# Altium PCB DAP-PCB-REV-3.2.PcbDoc (part 3 of 5)
Units mm, origin at the board's own origin, x right, y up, seen from the top; angles counter-clockwise.
Board outline 54.75 x 54.75 mm, 6 copper layers (L1 (SIG/PWR), L2 (GND), L3 (SIG), L4 (PWR), L5 (GND), L6 (SIG/PWR)), stack 1.65 mm thick; 308 components, 179 nets, 954 pads, 440 vias.
Unrouted connection lines stored in the file: 7.
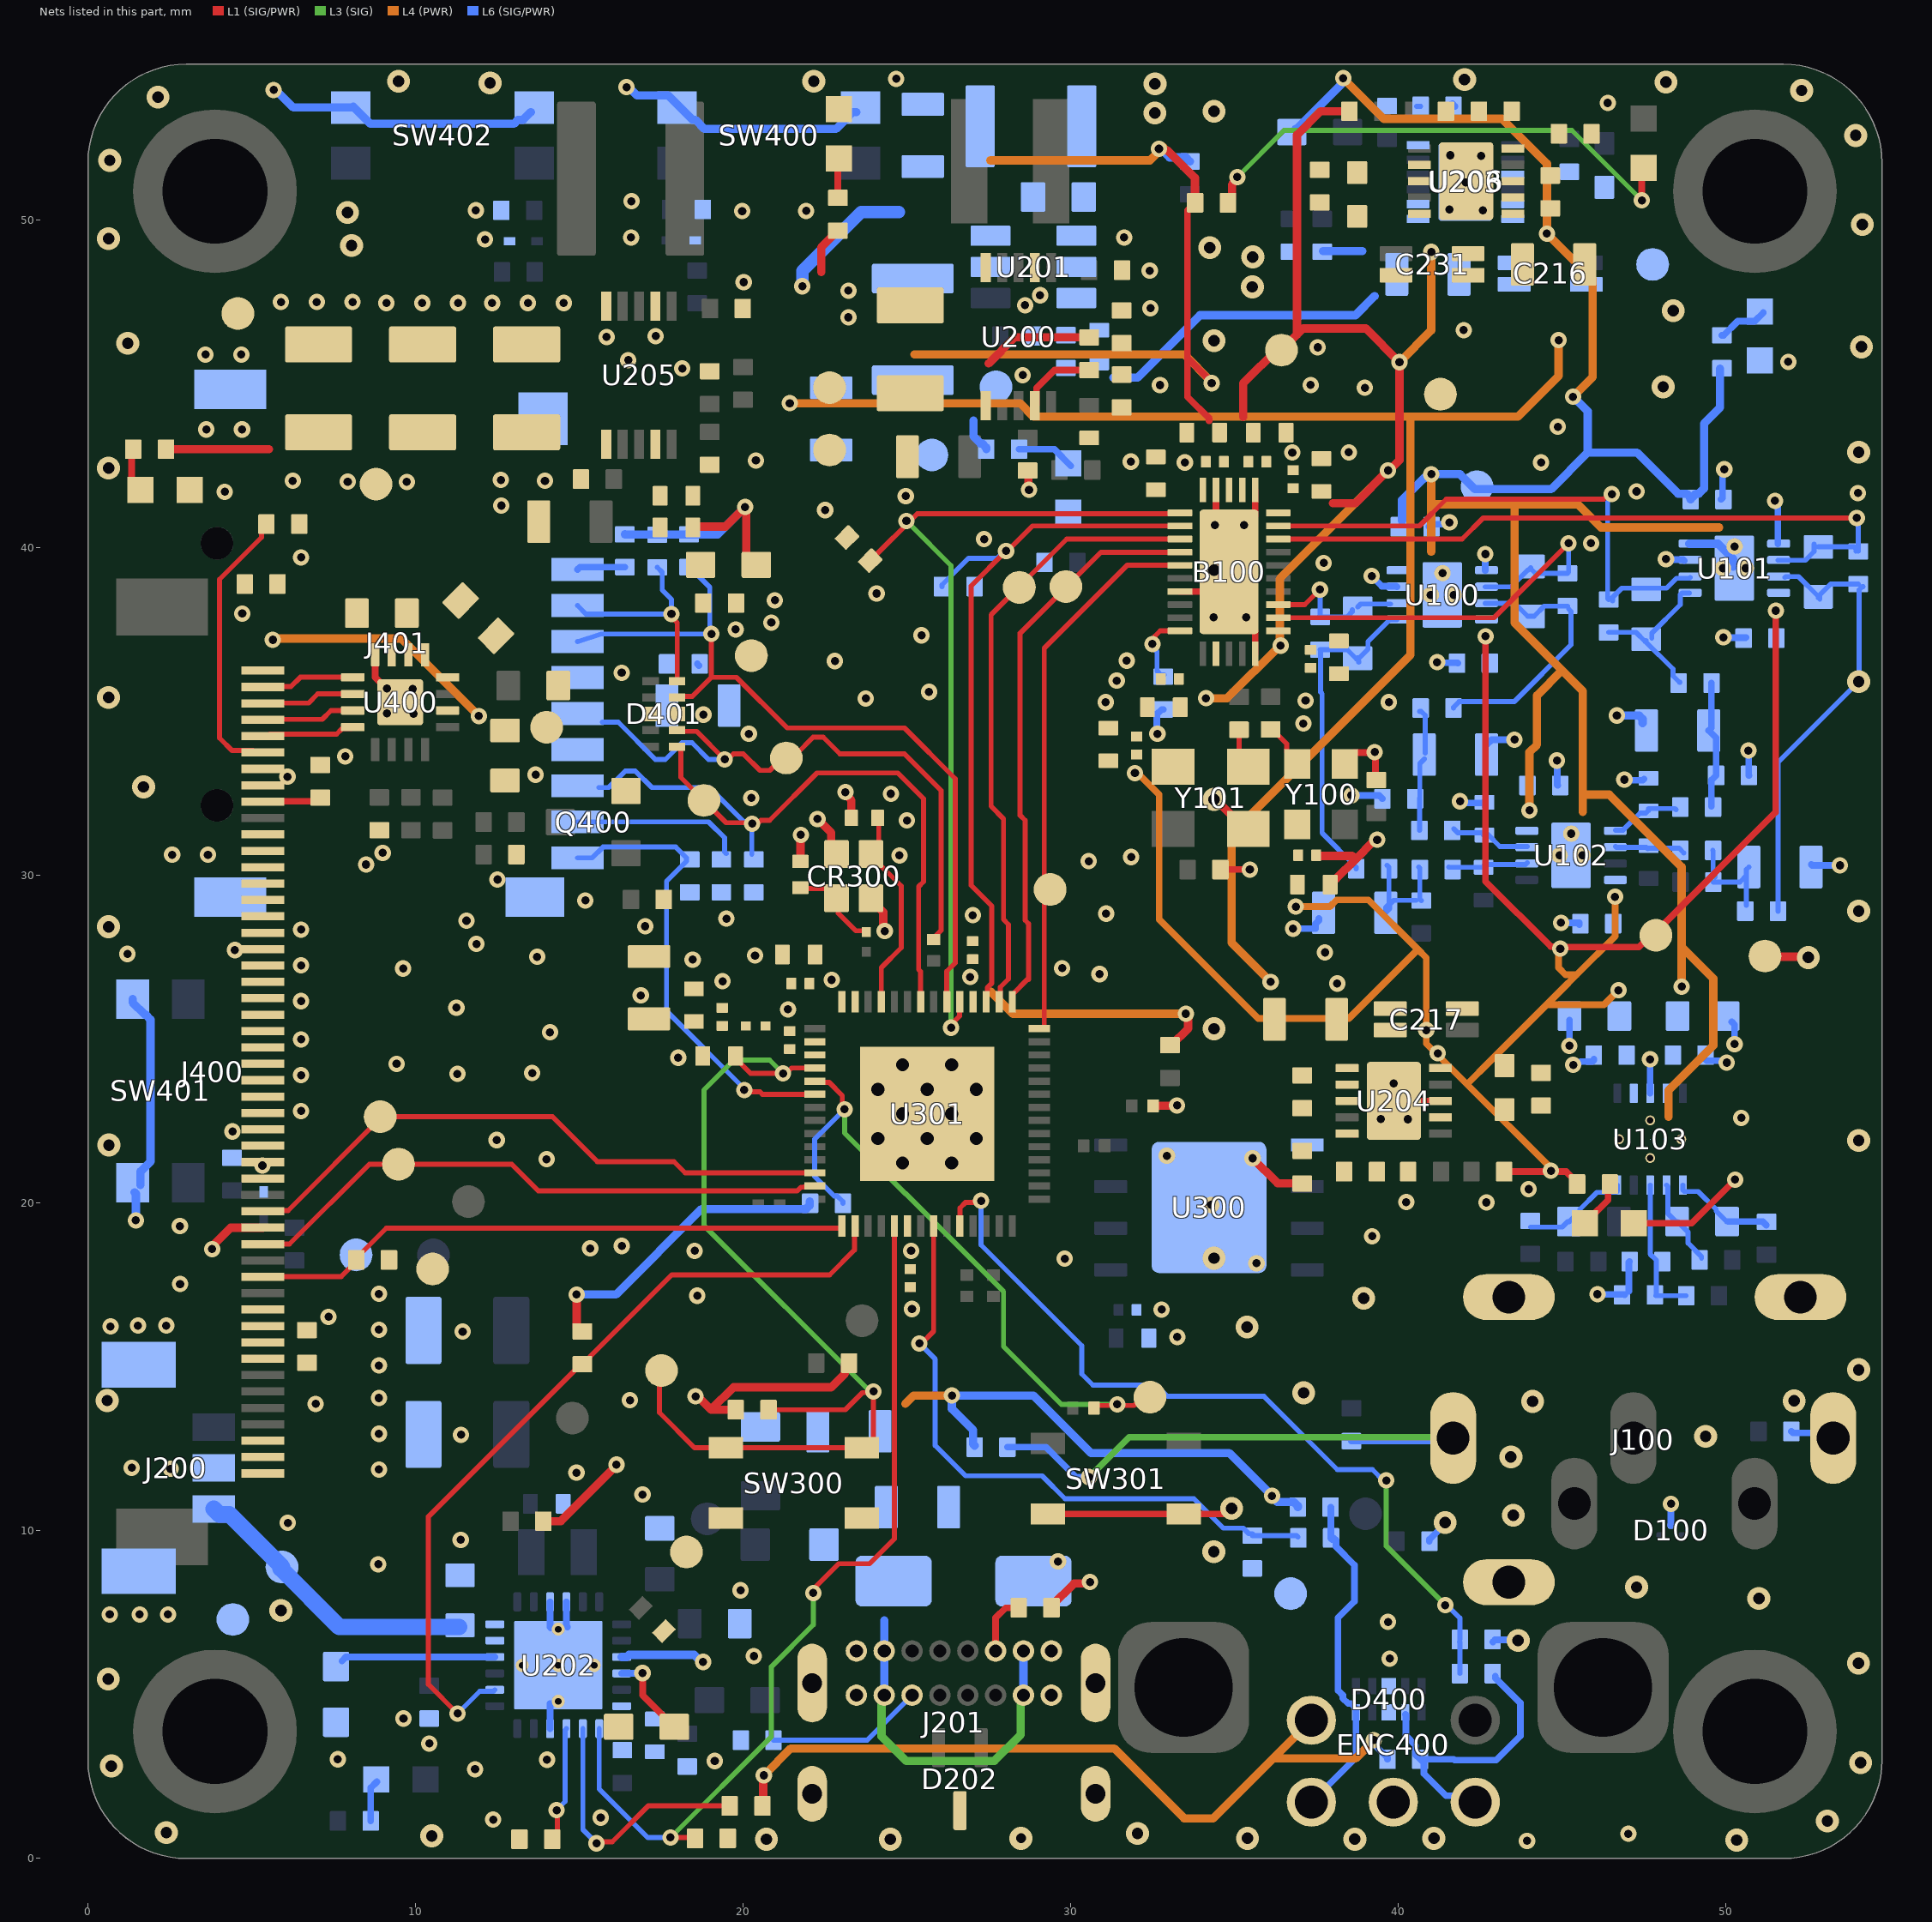
[diagram p6: the nets of this part, all layers, seen from the top]

## Part data (continued)
J200: library part #1-137, <Value>=3x1, Manufacturer 1=Molex, Manufacturer Part Number 1=5055670381, Package=None, Supplier Part Number 1=WM22227CT-ND, <Termination>=SMD, AL-PN=#1-137, Availability=Unavailable, Creator Project=DAP, Footprint Status=Unverified, Lead Time="19 Weeks", MF="{'manufacturer': u'Molex'}", MP=436500329, Notes="No Drawing", PartType=Connector, Price=None, Status=Unverified, SubType=Header, Supplier 1=Digikey, Supplier Label="Connector Header Surface Mount, Right Angle 3 position 0.049\" (1.25mm)", Type=Standard
J201: library part #1-069, <Rating>=5A, <Value>=48V, Manufacturer 1=GCT, Manufacturer Part Number 1=USB4085-GF-A, Package=None, Supplier Part Number 1=2073-USB4085-GF-ACT-ND, <Spec>=USB-C, <Termination>=Thru, AL-PN=#1-069, Availability="In Stock", Check_prices=https://www.snapeda.com/parts/USB4085-GF-A/Global+Connector+Technology/view-part/?ref=eda, Creator Project=DAP, Footprint Status=Verified, Lead Time="7 Weeks", MF="Global Connector Technology", MP=USB4085-GF-A, PartType=Connector, Price=None, Purchase-URL=https://pricing.snapeda.com/search/part/USB4085-GF-A/?ref=eda, SnapEDA_Link=https://www.snapeda.com/parts/USB4085-GF-A/Global+Connector+Technology/view-part/?ref=snap, Status=Unverified, SubType=USB, Supplier 1=Digikey, Supplier Label="USB-C (USB TYPE-C) USB 2.0 Receptacle Connector 24 (16+8 Dummy) Position Through Hole, Right Angle", Type=Standard
J400: library part #1-117, <Value>=50-Pin, Manufacturer 1="Amphenol ICC", Manufacturer Part Number 1=F32D-1A7Y1-21050, Package=None, Supplier Part Number 1=609-F32D-1A7Y1-21050CT-ND, <Footprint>=R/A, <Termination>=SMD, AL-PN=#1-117, Check_prices=https://www.snapeda.com/parts/F32D-1A7Y1-21050/Amphenol+FCI/view-part/?ref=eda, Creator Project=DAP, Footprint Status=Verified, Lead Time="13 Weeks", MF="Amphenol ICC (FCI)", MP=F32D-1A7Y1-21050, PartType=Connector, SnapEDA_Link=https://www.snapeda.com/parts/F32D-1A7Y1-21050/Amphenol+FCI/view-part/?ref=snap, Status=Unverified, SubType=FFC, Supplier 1=Digikey, Supplier Label="50 Position FFC, FPC Connector Contacts, Top and Bottom 0.020\" (0.50mm) Surface Mount, Right Angle", Type=Standard
J401: library part #1-126, Manufacturer 1="Same Sky", Manufacturer Part Number 1=MSD-1-A, Package=None, Supplier Part Number 1=2223-MSD-1-ACT-ND, <Termination>=SMD, AL-PN=#1-126, Check_prices=https://www.snapeda.com/parts/MSD-1-A/Same+Sky/view-part/?ref=eda, Creator Project=DAP, Footprint Status=Verified, Lead Time="8 Weeks", MF="Same Sky", MP=MSD-1-A, PartType=Connector, SnapEDA_Link=https://www.snapeda.com/parts/MSD-1-A/Same+Sky/view-part/?ref=snap, Status=Unverified, SubType=Micro-SD, Supplier 1=Digikey, Supplier Label="9 (8 + 1) Position Card Connector microSD™ Surface Mount, Right Angle Gold", Type=Standard
L200: library part #1-076, <Rating>=3.5A, <Tolerance>=0.2, <Value>=6.8uH, Manufacturer 1="Bourns Inc.", Manufacturer Part Number 1=SRP4030FA-6R8M, Supplier Part Number 1=SRP4030FA-6R8MCT-ND, <Spec>=74.1mOhm, <Termination>=SMD, AL-PN=#1-076, Creator Project=DAP, Footprint Status=Verified, Lead Time="22 Weeks", PartType=Inductor, Status=Unverified, SubType=Shielded, Supplier 1=Digikey, Supplier Label="6.8 µH Shielded Drum Core, Wirewound Inductor 4 A 74.1mOhm Max Nonstandard", Type=Standard
L201 L202: library part #1-090, <Rating>=400mA, <Tolerance>=0.2, <Value>=22uH, Manufacturer 1="Murata Electronics", Manufacturer Part Number 1=490-LQW32FT220M2HLTR, Supplier Part Number 1=490-LQW32FT220M2HLCT-ND, <Footprint>=1210, <Spec>=810mOhm, <Termination>=SMD, AL-PN=#1-090, Creator Project=DAP, Footprint Status=Verified, Lead Time="25 Weeks", Notes="No 3D", PartType=Inductor, Status=Unverified, SubType=Shielded, Supplier 1=Digikey, Supplier Label="22 µH Shielded Wirewound Inductor 300 mA 810mOhm Max 1210 (3225 Metric)", Type=Standard
L203: library part #1-151, <Rating>=2A, <Tolerance>=0.2, <Value>=1uH, Manufacturer 1="Murata Electronics", Manufacturer Part Number 1=DFE201210U-1R0M=P2, Supplier Part Number 1=490-18104-1-ND, <Spec>=95mOhm, <Termination>=SMD, AL-PN=#1-151, Creator Project=DAP, Footprint Status=Verified, Lead Time="21 Weeks", PartType=Inductor, Status=Unverified, SubType=Shielded, Supplier 1=Digikey, Supplier Label="1 µH Shielded Drum Core, Wirewound Inductor 2 A 95mOhm Max 0805 (2012 Metric)", Type=Standard
L204: library part #1-094, <Rating>=3.7A, <Tolerance>=0.2, <Value>=18uH, Manufacturer 1=Coilcraft, Manufacturer Part Number 1=XGL5050-183MEC, Supplier Part Number 1=2457-XGL5050-183MEC-ND, <Spec>=62.5mOhm, <Termination>=SMD, AL-PN=#1-094, Creator Project=DAP, Footprint Status=Verified, Lead Time=N/A, PartType=Inductor, Status=Unverified, SubType=Shielded, Supplier 1=Digikey, Supplier Label="18 µH Shielded Molded Inductor 4.5 A 62.5mOhm Max Nonstandard", Type=Standard
L300: library part #1-143, <Rating>=600mA, <Value>=2nH, Manufacturer 1="Murata Electronics", Manufacturer Part Number 1=LQP03HQ2N0B02D, Supplier Part Number 1=490-13895-1-ND, <Footprint>=0201, <Spec>=120mOhm, <Termination>=SMD, AL-PN=#1-143, Creator Project=DAP, Footprint Status=Verified, Lead Time="15 Weeks", PartType=Inductor, Status=Unverified, SubType=Shielded, Supplier 1=Digikey, Supplier Label="2 nH Unshielded Thick Film Inductor 600 mA 120mOhm Max 0201 (0603 Metric)", Type=Standard
L301: library part #1-150, <Rating>=140mA, <Tolerance>=0.03, <Value>=24nH, Manufacturer 1="Murata Electronics", Manufacturer Part Number 1=LQP03TN24NH02D, Supplier Part Number 1=490-13004-1-ND, <Footprint>=0201, <Spec>=2.3Ohm, <Termination>=SMD, AL-PN=#1-150, Creator Project=DAP, Footprint Status=Verified, Lead Time="15 Weeks", PartType=Inductor, Status=Unverified, SubType=Shielded, Supplier 1=Digikey, Supplier Label="24 nH Unshielded Thick Film Inductor 140 mA 2.3Ohm Max 0201 (0603 Metric)", Type=Standard
Q400: library part #1-130, <Rating>=2.5Vgs, <Value>=N-Type, Manufacturer 1=MCC, Manufacturer Part Number 1=2N7002-TP, Package="TO-236 MCC", Supplier Part Number 1=2N7002-TPMSCT-ND, <Termination>=SMD, AL-PN=#1-130, Check_prices=https://www.snapeda.com/parts/2N7002-TP/Micro+Commercial/view-part/?ref=eda, Creator Project=DAP, Footprint Status=Verified, Lead Time=N/A, MF="Micro Commercial", MP=2N7002-TP, PartType=Transistor, SnapEDA_Link=https://www.snapeda.com/parts/2N7002-TP/Micro+Commercial/view-part/?ref=snap, Status=Unverified, SubType=MOSFET, Supplier 1=Digikey, Supplier Label="N-Channel 60 V 115mA (Ta) 1.08W Surface Mount SOT-23", Type=Standard
R100 R101 R102 R103 R116 R117 R121 R123 R131 R134: library part #1-105, <Rating>=1/16W, <Tolerance>=0.001, <Value>=499Ohm, Manufacturer 1=YAGEO, Manufacturer Part Number 1=RT0402BRD07499RL, Supplier Part Number 1=YAG1440CT-ND, <Footprint>=0402, <Termination>=SMD, AL-PN=#1-105, Creator Project=DAP, Footprint Status=Verified, Lead Time="23 Weeks", PartType=Resistor, Status=Unverified, Supplier 1=Digikey, Supplier Label="499 Ohms ±0.1% 0.063W, 1/16W Chip Resistor 0402 (1005 Metric) Thin Film", Type=Standard
R104 R105: library part #1-102, <Rating>=1/16W, <Tolerance>=0.01, <Value>=22Ohm, Manufacturer 1=YAGEO, Manufacturer Part Number 1=RC0402FR-0722RL, Supplier Part Number 1=311-22.0LRCT-ND, <Footprint>=0402, <Termination>=SMD, AL-PN=#1-102, Creator Project=DAP, Footprint Status=Verified, Lead Time="22 Weeks", PartType=Resistor, Status=Unverified, Supplier 1=Digikey, Supplier Label="22 Ohms ±1% 0.063W, 1/16W Chip Resistor 0402 (1005 Metric) Moisture Resistant Thick Film", Type=Standard
R106 R107 R111 R112 R113 R119 R129 R135 R208 R209 R210 R211 R216 R221 R223 R242 R300 R301 R400 R401 R402 R403 R404 R405 R406 R407 R408 R412 R413 R414 R415 R416 R417 R418 R419 R422: library part #1-134, <Tolerance>=0.01, <Value>=10kOhm, Manufacturer 1=YAGEO, Manufacturer Part Number 1=AC0402FR-0710KL, Supplier Part Number 1=YAG3436CT-ND, <Footprint>=0402, <Termination>=SMD, AL-PN=#1-134, Creator Project=DAP, Footprint Status=Verified, Lead Time="22 Weeks", PartType=Resistor, Status=Unverified, Supplier 1=Digikey, Supplier Label="10 kOhms ±1% 0.063W, 1/16W Chip Resistor 0402 (1005 Metric) Automotive AEC-Q200, Moisture Resistant Thick Film", Type=Standard
R108 R207 R226 R231 R238 R247: library part #1-138, <Tolerance>=0.001, <Value>=49.9kOhm, Manufacturer 1=YAGEO, Manufacturer Part Number 1=RT0402BRD0749K9L, Supplier Part Number 1=YAG4270CT-ND, <Footprint>=0402, <Termination>=SMD, AL-PN=#1-138, Creator Project=DAP, Footprint Status=Verified, Lead Time="23 Weeks", PartType=Resistor, Status=Unverified, Supplier 1=Digikey, Supplier Label="49.9 kOhms ±0.1% 0.063W, 1/16W Chip Resistor 0402 (1005 Metric) Thin Film", Type=Standard
R114 R115 R126 R133: library part #1-109, <Rating>=1/16W, <Tolerance>=0.001, <Value>=220Ohm, Manufacturer 1=YAGEO, Manufacturer Part Number 1=RT0402BRD07220RL, Supplier Part Number 1=YAG4207CT-ND, <Footprint>=0402, <Termination>=SMD, AL-PN=#1-109, Creator Project=DAP, Footprint Status=Verified, Lead Time="23 Weeks", PartType=Resistor, Status=Unverified, Supplier 1=Digikey, Supplier Label="220 Ohms ±0.1% 0.063W, 1/16W Chip Resistor 0402 (1005 Metric) Thin Film", Type=Standard
R118 R204 R205 R212 R228 R239 R240 R241 R245 R420 R421 R424 R425: library part #1-131, <Tolerance>=0.01, <Value>=100kOhm, Manufacturer 1=YAGEO, Manufacturer Part Number 1=RT0402BRD07100KL, Supplier Part Number 1=YAG1343CT-ND, <Footprint>=0402, <Termination>=SMD, AL-PN=#1-131, Creator Project=DAP, Footprint Status=Verified, Lead Time="23 Weeks", PartType=Resistor, Status=Unverified, Supplier 1=Digikey, Supplier Label="100 kOhms ±0.1% 0.063W, 1/16W Chip Resistor 0402 (1005 Metric) Thin Film", Type=Standard
R120 R122 R124 R132: library part #1-110, <Rating>=1/16W, <Tolerance>=0.001, <Value>=681Ohm, Manufacturer 1=YAGEO, Manufacturer Part Number 1=RT0402BRD07681RL, Supplier Part Number 1=YAG1466CT-ND, <Footprint>=0402, <Termination>=SMD, AL-PN=#1-110, Creator Project=DAP, Footprint Status=Verified, Lead Time="23 Weeks", PartType=Resistor, Status=Unverified, Supplier 1=Digikey, Supplier Label="681 Ohms ±0.1% 0.063W, 1/16W Chip Resistor 0402 (1005 Metric) Thin Film", Type=Standard
R125 R127: library part #1-113, <Rating>=1/16W, <Tolerance>=0.001, <Value>=4.7Ohm, Manufacturer 1=YAGEO, Manufacturer Part Number 1=RT0402BRE074R7L, Supplier Part Number 1=13-RT0402BRE074R7LCT-ND, <Footprint>=0402, <Termination>=SMD, AL-PN=#1-113, Creator Project=DAP, Footprint Status=Verified, Lead Time="23 Weeks", PartType=Resistor, Status=Unverified, Supplier 1=Digikey, Supplier Label="4.7 Ohms ±0.1% 0.063W, 1/16W Chip Resistor 0402 (1005 Metric) Thin Film", Type=Standard
R128 R203 R237: library part #1-079, <Rating>=1/16W, <Tolerance>=0.001, <Value>=54.9kOhm, Manufacturer 1=YAGEO, Manufacturer Part Number 1=RT0402BRD0754K9L, Supplier Part Number 1=YAG1452CT-ND, <Footprint>=0402, <Termination>=SMD, AL-PN=#1-079, Creator Project=DAP, Footprint Status=Verified, Lead Time="20 Weeks", PartType=Resistor, Status=Unverified, Supplier 1=Digikey, Supplier Label="54.9 kOhms ±0.1% 0.063W, 1/16W Chip Resistor 0402 (1005 Metric) Thin Film", Type=Standard
R200: library part #1-074, <Rating>=1/16W, <Tolerance>=0.001, <Value>=220kOhm, Manufacturer 1=YAGEO, Manufacturer Part Number 1=RC0402BR-07220KL, Supplier Part Number 1=13-RC0402BR-07220KLCT-ND, <Footprint>=0402, <Termination>=SMD, AL-PN=#1-074, Creator Project=DAP, Footprint Status=Verified, Lead Time="17 Weeks", PartType=Resistor, Status=Unverified, Supplier 1=Digikey, Supplier Label="220 kOhms ±0.1% 0.063W, 1/16W Chip Resistor 0402 (1005 Metric) Moisture Resistant Thick Film", Type=Standard
R201: library part #1-091, <Rating>=1/16W, <Tolerance>=0.001, <Value>=309kOhm, Manufacturer 1=YAGEO, Manufacturer Part Number 1=RE0402BRE07309KL, Supplier Part Number 1=13-RE0402BRE07309KLCT-ND, <Footprint>=0402, <Termination>=SMD, AL-PN=#1-091, Creator Project=DAP, Footprint Status=Verified, Lead Time="20 Weeks", PartType=Resistor, Status=Unverified, Supplier 1=Digikey, Supplier Label="309 kOhms ±0.1% 0.063W, 1/16W Chip Resistor 0402 (1005 Metric) Thick Film", Type=Standard
R202: library part #1-067, <Rating>=0.1W, <Tolerance>=0.005, <Value>=274kOhm, Manufacturer 1=YAGEO, Manufacturer Part Number 1=RT0603DRE07274KL, Supplier Part Number 1=13-RT0603DRE07274KLCT-ND, <Footprint>=0603, <Termination>=SMD, AL-PN=#1-067, Creator Project=DAP, Footprint Status=Verified, Lead Time="20 Weeks", PartType=Resistor, Status=Unverified, Supplier 1=Digikey, Supplier Label="RES SMD 274K OHM 0.5% 1/10W 0603", Type=Standard
R206 R229 R246 R249 R250 R251 R252 R253 R409 R410 R411: library part #1-043, <Rating>=1/16W, <Tolerance>=0.001, <Value>=1kOhm, Manufacturer 1=YAGEO, Manufacturer Part Number 1=RT0402BRD071KL, Supplier Part Number 1=YAG1386TR-ND, <Footprint>=0402, <Termination>=SMD, AL-PN=#1-043, Creator Project=aRTy, Footprint Status=Verified, Lead Time="20 Weeks", PartType=Resistor, Status=Unverified, Supplier 1=Digikey, Supplier Label="1 kOhms ±0.1% 0.063W, 1/16W Chip Resistor 0402 (1005 Metric) Thin Film", Type=Standard
R213 R224: library part #1-078, <Rating>=1/16W, <Tolerance>=0.001, <Value>=15kOhm, Manufacturer 1=YAGEO, Manufacturer Part Number 1=RT0402BRD0715KL, Supplier Part Number 1=YAG2302CT-ND, <Footprint>=0402, <Termination>=SMD, AL-PN=#1-078, Creator Project=DAP, Footprint Status=Verified, Lead Time="20 Weeks", PartType=Resistor, Status=Unverified, Supplier 1=Digikey, Supplier Label="15 kOhms ±0.1% 0.063W, 1/16W Chip Resistor 0402 (1005 Metric) Thin Film", Type=Standard
R214: library part #1-060, <Rating>=1/16W, <Tolerance>=0.01, <Value>=5kOhm, Manufacturer 1=YAGEO, Manufacturer Part Number 1=RC0402FR-075KL, Supplier Part Number 1=13-RC0402FR-075KLCT-ND, <Footprint>=0402, <Termination>=SMD, AL-PN=#1-060, Creator Project=DAP, Footprint Status=Verified, Lead Time="17 Weeks", PartType=Resistor, Status=Unverified, Supplier 1=Digikey, Supplier Label="5 kOhms ±1% 0.063W, 1/16W Chip Resistor 0402 (1005 Metric) Moisture Resistant Thick Film", Type=Standard
R215: library part #1-061, <Rating>=1/16W, <Tolerance>=0.005, <Value>=9.88kOhm, Manufacturer 1=YAGEO, Manufacturer Part Number 1=RT0402DRD079K88L, Supplier Part Number 1=311-2214-1-ND, <Footprint>=0402, <Termination>=SMD, AL-PN=#1-061, Creator Project=DAP, Footprint Status=Verified, Lead Time="20 Weeks", PartType=Resistor, Status=Unverified, Supplier 1=Digikey, Supplier Label="9.88 kOhms ±0.5% 0.063W, 1/16W Chip Resistor 0402 (1005 Metric) Thin Film", Type=Standard
R217: library part #1-065, <Rating>=0.1W, <Tolerance>=0.01, <Value>=270Ohm, Manufacturer 1=YAGEO, Manufacturer Part Number 1=RC0603FR-07270RL, Supplier Part Number 1=311-270HRCT-ND, <Footprint>=0603, <Termination>=SMD, AL-PN=#1-065, Creator Project=DAP, Footprint Status=Verified, Lead Time="17 Weeks", PartType=Resistor, Status=Unverified, Supplier 1=Digikey, Supplier Label="270 Ohms ±1% 0.1W, 1/10W Chip Resistor 0603 (1608 Metric) Moisture Resistant Thick Film", Type=Standard
R218: library part #1-064, <Rating>=0.1W, <Tolerance>=0.001, <Value>=500Ohm, Manufacturer 1=YAGEO, Manufacturer Part Number 1=RT0603BRC07500RL, Supplier Part Number 1=13-RT0603BRC07500RLCT-ND, <Footprint>=0603, <Termination>=SMD, AL-PN=#1-064, Creator Project=DAP, Footprint Status=Verified, Lead Time="20 Weeks", PartType=Resistor, Status=Unverified, Supplier 1=Digikey, Supplier Label="500 Ohms ±0.1% 0.1W, 1/10W Chip Resistor 0603 (1608 Metric) Thin Film", Type=Standard
R219: library part #1-087, <Rating>=1/16W, <Tolerance>=0.01, <Value>=88.7kOhm, Manufacturer 1=YAGEO, Manufacturer Part Number 1=RC0402FR-0788K7L, Supplier Part Number 1=311-88.7KLRCT-ND, <Footprint>=0402, <Termination>=SMD, AL-PN=#1-087, Creator Project=DAP, Footprint Status=Verified, Lead Time="17 Weeks", PartType=Resistor, Status=Unverified, Supplier 1=Digikey, Supplier Label="88.7 kOhms ±1% 0.063W, 1/16W Chip Resistor 0402 (1005 Metric) Moisture Resistant Thick Film", Type=Standard
R220: library part #1-086, <Rating>=1/10W, <Tolerance>=0.001, <Value>=135kOhm, Manufacturer 1=YAGEO, Manufacturer Part Number 1=RT0603BRD07135KL, Supplier Part Number 1=13-RT0603BRD07135KLCT-ND, <Footprint>=0603, <Termination>=SMD, AL-PN=#1-086, Creator Project=DAP, Footprint Status=Verified, Lead Time="20 Weeks", PartType=Resistor, Status=Unverified, Supplier 1=Digikey, Supplier Label="135 kOhms ±0.1% 0.1W, 1/10W Chip Resistor 0603 (1608 Metric) Thin Film", Type=Standard
R222 R243: library part #1-083, <Rating>=1/16W, <Tolerance>=0.01, <Value>=909kOhm, Manufacturer 1=YAGEO, Manufacturer Part Number 1=RC0402FR-07909KL, Supplier Part Number 1=YAG2377CT-ND, <Footprint>=0402, <Termination>=SMD, AL-PN=#1-083, Creator Project=DAP, Footprint Status=Verified, Lead Time="17 Weeks", PartType=Resistor, Status=Unverified, Supplier 1=Digikey, Supplier Label="909 kOhms ±1% 0.063W, 1/16W Chip Resistor 0402 (1005 Metric) Moisture Resistant Thick Film", Type=Standard
R225 R244: library part #1-084, <Rating>=1/16W, <Tolerance>=0.001, <Value>=90.9kOhm, Manufacturer 1=YAGEO, Manufacturer Part Number 1=RT0402BRD0790K9L, Supplier Part Number 1=YAG1489CT-ND, <Footprint>=0402, <Termination>=SMD, AL-PN=#1-084, Creator Project=DAP, Footprint Status=Verified, Lead Time="20 Weeks", PartType=Resistor, Status=Unverified, Supplier 1=Digikey, Supplier Label="90.9 kOhms ±0.1% 0.063W, 1/16W Chip Resistor 0402 (1005 Metric) Thin Film", Type=Standard
R227: library part #1-149, <Rating>=1/4W, <Tolerance>=0.01, <Value>=0.5Ohms, Manufacturer 1=YAGEO, Manufacturer Part Number 1=PT0805FR-7W0R5L, Supplier Part Number 1=13-PT0805FR-7W0R5LCT-ND, <Footprint>=0805, <Termination>=SMD, AL-PN=#1-149, Creator Project=DAP, Footprint Status=Verified, Lead Time="20 Weeks", PartType=Resistor, Status=Unverified, Supplier 1=Digikey, Supplier Label="500 mOhms ±1% 0.25W, 1/4W Chip Resistor 0805 (2012 Metric) Automotive AEC-Q200, Current Sense, Moisture Resistant Thick Film", Type=Standard
R230: library part #1-088, <Rating>=1/16W, <Tolerance>=0.01, <Value>=15.4kOhm, Manufacturer 1=YAGEO, Manufacturer Part Number 1=RT0402BRD0715K4L, Supplier Part Number 1=YAG4177CT-ND, <Footprint>=0402, <Termination>=SMD, AL-PN=#1-088, Creator Project=DAP, Footprint Status=Verified, Lead Time="20 Weeks", PartType=Resistor, Status=Unverified, Supplier 1=Digikey, Supplier Label="15.4 kOhms ±0.1% 0.063W, 1/16W Chip Resistor 0402 (1005 Metric) Thin Film", Type=Standard
R232 R233 R248: library part #1-085, <Rating>=1/16W, <Tolerance>=0.001, <Value>=33.2kOhm, Manufacturer 1=YAGEO, Manufacturer Part Number 1=RT0402BRD0733K2L, Supplier Part Number 1=YAG4244CT-ND, <Footprint>=0402, <Termination>=SMD, AL-PN=#1-085, Creator Project=DAP, Footprint Status=Verified, Lead Time="20 Weeks", PartType=Resistor, Status=Unverified, Supplier 1=Digikey, Supplier Label="33.2 kOhms ±0.1% 0.063W, 1/16W Chip Resistor 0402 (1005 Metric) Thin Film", Type=Standard
R234 R235: library part #1-024, <Rating>=1/16W, <Tolerance>=0.001, <Value>=5.1kOhm, Manufacturer 1=YAGEO, Manufacturer Part Number 1=RT0402BRE075K1L, Supplier Part Number 1=YAG4404TR-ND, <Footprint>=0402, <Termination>=SMD, AL-PN=#1-024, Creator Project=aRTy, Footprint Status=Verified, Lead Time="20 Weeks", PartType=Resistor, Status=Unverified, Supplier 1=Digikey, Supplier Label="5.1 kOhms ±0.1% 0.063W, 1/16W Chip Resistor 0402 (1005 Metric) Thin Film", Type=Standard
R236: library part #1-095, <Rating>=1/10W, <Tolerance>=0.001, <Value>=172kOhm, Manufacturer 1=YAGEO, Manufacturer Part Number 1=RT0603BRD07172KL, Supplier Part Number 1=13-RT0603BRD07172KLCT-ND, <Footprint>=0603, <Termination>=SMD, AL-PN=#1-095, Creator Project=DAP, Footprint Status=Verified, Lead Time="20 Weeks", PartType=Resistor, Status=Unverified, Supplier 1=Digikey, Supplier Label="172 kOhms ±0.1% 0.1W, 1/10W Chip Resistor 0603 (1608 Metric) Thin Film", Type=Standard
R302: library part #1-147, <Rating>=1/20W, <Tolerance>=0.01, <Value>=1kOhm, Manufacturer 1=YAGEO, Manufacturer Part Number 1=RC0201FR-071KL, Supplier Part Number 1=311-1KMCT-ND, <Termination>=SMD, AL-PN=#1-147, Creator Project=DAP, Footprint Status=Verified, Lead Time="24 Weeks", PartType=Resistor, Status=Unverified, Supplier 1=Digikey, Supplier Label="1 kOhms ±1% 0.05W, 1/20W Chip Resistor 0201 (0603 Metric) Moisture Resistant Thick Film", Type=Standard
R303: library part #1-148, <Rating>=1/20W, <Tolerance>=0.01, <Value>=1MOhm, Manufacturer 1=YAGEO, Manufacturer Part Number 1=RC0201FR-071ML, Supplier Part Number 1=311-1MMCT-ND, <Footprint>=0201, <Termination>=SMD, AL-PN=#1-148, Creator Project=DAP, Footprint Status=Verified, Lead Time="24 Weeks", PartType=Resistor, Status=Unverified, Supplier 1=Digikey, Supplier Label="1 MOhms ±1% 0.05W, 1/20W Chip Resistor 0201 (0603 Metric) Moisture Resistant Thick Film", Type=Standard
R304 R305 R306 R307 R308: library part #1-146, <Rating>=1/20W, <Tolerance>=0.01, <Value>=22Ohm, Manufacturer 1=YAGEO, Manufacturer Part Number 1=RC0201FR-0722RL, Supplier Part Number 1=YAG2518CT-ND, <Footprint>=0201, <Termination>=SMD, AL-PN=#1-146, Creator Project=DAP, Footprint Status=Verified, Lead Time="24 Weeks", PartType=Resistor, Status=Unverified, Supplier 1=Digikey, Supplier Label="22 Ohms ±1% 0.05W, 1/20W Chip Resistor 0201 (0603 Metric) Moisture Resistant Thick Film", Type=Standard
R423: library part #1-133, <Tolerance>=0.01, <Value>=32.4kOhm, Manufacturer 1=YAGEO, Manufacturer Part Number 1=RC0402FR-0732K4L, Supplier Part Number 1=YAG3119CT-ND, <Footprint>=0402, <Termination>=SMD, AL-PN=#1-133, Creator Project=DAP, Footprint Status=Verified, Lead Time="22 Weeks", PartType=Resistor, Status=Unverified, Supplier 1=Digikey, Supplier Label="32.4 kOhms ±1% 0.063W, 1/16W Chip Resistor 0402 (1005 Metric) Moisture Resistant Thick Film", Type=Standard
SW300: library part #1-115, <Value>=SPST, Manufacturer 1=C&K, Manufacturer Part Number 1="PTS810SJM250SMTR LFS", Package=None, Supplier Part Number 1=CKN10502CT-ND, <Footprint>=Vert, <Termination>=SMD, AL-PN=#1-115, Check_prices=https://www.snapeda.com/parts/PTS810%20SJM%20250%20SMTR%20LFS/C%2526K/view-part/?ref=eda, Creator Project=DAP, Footprint Status=Verified, Lead Time="16 Weeks", MF=C&K, MP="PTS810 SJM 250 SMTR LFS", PartType=Switch, SnapEDA_Link=https://www.snapeda.com/parts/PTS810%20SJM%20250%20SMTR%20LFS/C%2526K/view-part/?ref=snap, Status=Unverified, SubType=Tacticle, Supplier 1=Digikey, Supplier Label="Tactile Switch SPST-NO Top Actuated Surface Mount", Type=Standard
SW301: library part #1-115, Manufacturer 1=C&K, Manufacturer Part Number 1="PTS810SJM250SMTR LFS", Package=None, Supplier Part Number 1=CKN10502CT-ND, <Footprint>=Vert, <Termination>=SMD, AL-PN=#1-115, Check_prices=https://www.snapeda.com/parts/PTS810%20SJM%20250%20SMTR%20LFS/C%2526K/view-part/?ref=eda, Creator Project=DAP, Footprint Status=Verified, Lead Time="16 Weeks", MF=C&K, MP="PTS810 SJM 250 SMTR LFS", PartType=Switch, SnapEDA_Link=https://www.snapeda.com/parts/PTS810%20SJM%20250%20SMTR%20LFS/C%2526K/view-part/?ref=snap, Status=Unverified, SubType=Tacticle, Supplier 1=Digikey, Supplier Label="Tactile Switch SPST-NO Top Actuated Surface Mount", Type=Standard
SW400 SW401 SW402: library part #1-114, <Value>=SPST, Manufacturer 1=E-Switch, Manufacturer Part Number 1=TL1014BF220QG, Supplier Part Number 1=141-TL1014BF220QGCT-ND, <Footprint>=R/A, <Termination>=SMD, AL-PN=#1-114, Creator Project=DAP, Footprint Status=Verified, Lead Time="7 Weeks", PartType=Switch, Status=Unverified, SubType=Tacticle, Supplier 1=Digikey, Supplier Label="Tactile Switch SPST-NO Side Actuated Surface Mount, Right Angle", Type=Standard
U100 U101 U102: library part #1-104, Manufacturer 1="Texas Instruments", Manufacturer Part Number 1=OPA1612AIDRGR, Supplier Part Number 1=296-38367-1-ND, <Termination>=SMD, AL-PN=#1-104, Creator Project=DAP, Footprint Status=Verified, Lead Time="16 Weeks", PartType=IC, Status=Unverified, SubType=Op-Amp, Supplier 1=Digikey, Supplier Label="Audio Amplifier 2 Circuit Rail-to-Rail 8-SON (3x3)", Type=Standard
U103: library part #1-056, Manufacturer 1="Texas Instruments", Manufacturer Part Number 1=OPA1622IDRCR, Package="VSON-10 Texas Instruments", Supplier Part Number 1=296-45038-1-ND, <Termination>=SMD, AL-PN=#1-056, Check_prices=https://www.snapeda.com/parts/OPA1622IDRCR/Texas+Instruments/view-part/?ref=eda, Creator Project=DAP, Footprint Status=Verified, Lead Time="16 Weeks", MF="Texas Instruments", MP=OPA1622IDRCR, PartType=IC, SnapEDA_Link=https://www.snapeda.com/parts/OPA1622IDRCR/Texas+Instruments/view-part/?ref=snap, Status=Unverified, SubType=Op-Amp, Supplier 1=Digikey, Supplier Label="Audio Amplifier 2 Circuit 10-VSON (3x3)", Type=Standard
U200 U205: library part #1-050, Manufacturer 1="Analog Devices", Manufacturer Part Number 1=LTC3440EMS#TRPBF, Package="MSOP-10 Linear Technology", Supplier Part Number 1=LTC3440EMS#TRPBFCT-ND, <Termination>=SMD, AL-PN=#1-050, Check_prices=https://www.snapeda.com/parts/LTC3440EMS%23TRPBF/Analog+Devices/view-part/?ref=eda, Creator Project=DAP, Footprint Status=Verified, Lead Time="21 Weeks", MF="Analog Devices", MP=LTC3440EMS#TRPBF, PartType=IC, SnapEDA_Link=https://www.snapeda.com/parts/LTC3440EMS%23TRPBF/Analog+Devices/view-part/?ref=snap, Status=Unverified, SubType=Buck-Boost, Supplier 1=Digikey, Supplier Label="Buck-Boost Switching Regulator IC Positive Adjustable 2.5V 1 Output 600mA 10-TFSOP, 10-MSOP (0.118\", 3.00mm Width)", Type=Standard
U201: library part #1-089, Manufacturer 1="Analog Devices", Manufacturer Part Number 1=LT3462AES6#TRPBF, Manufacturer_Name="Analog Devices Inc", Manufacturer_Part_Number=LT3093EDD#TRPBF, Supplier Part Number 1=LT3462AES6#TRPBFCT-ND, <Termination>=SMD, AL-PN=#1-089, Copyright="Copyright (C) 2026 Ultra Librarian. All rights reserved.", Creator Project=DAP, Footprint Status=Verified, Lead Time="10 Weeks", PartType=IC, RefDes=RefDes, Status=Unverified, SubType=Regulator, Supplier 1=Digikey, Supplier Label="Cuk Switching Regulator IC Negative Adjustable -1.265V 1 Output 250mA SOT-23-6 Thin, TSOT-23-6", Type=Standard
U202: library part #1-054, Manufacturer 1="Texas Instruments", Manufacturer Part Number 1=BQ24250RGET, Package="VQFN-24 Texas Instruments", Supplier Part Number 1=296-36180-1-ND, <Termination>=SMD, AL-PN=#1-054, Check_prices=https://www.snapeda.com/parts/BQ24250RGET/Texas+Instruments/view-part/?ref=eda, Creator Project=DAP, Footprint Status=Verified, Lead Time="16 Weeks", MF="Texas Instruments", MP=BQ24250RGET, PartType=IC, SnapEDA_Link=https://www.snapeda.com/parts/BQ24250RGET/Texas+Instruments/view-part/?ref=snap, Status=Unverified, SubType=Charger, Supplier 1=Digikey, Supplier Label="Charger IC Lithium Ion 24-VQFN (4x4)", Type=Standard
U203: library part #1-052, Manufacturer 1="Analog Devices", Manufacturer Part Number 1=LT3093EDD#TRPBF, Manufacturer_Name="Analog Devices Inc", Supplier Part Number 1=505-LT3093EDD#TRPBFCT-ND, <Termination>=SMD, AL-PN=#1-052, Copyright="Copyright (C) 2026 Ultra Librarian. All rights reserved.", Creator Project=DAP, Footprint Status=Verified, Lead Time="21 Weeks", Manufacturer_Part_Number=LT3093EDD#TRPBF, PartType=IC, RefDes=RefDes, Status=Unverified, SubType=LDO, Supplier 1=Digikey, Supplier Label="Linear Voltage Regulator IC Negative Adjustable 1 Output 200mA 12-DFN (3x3)", Type=Standard
U204 U206: library part #1-051, Manufacturer 1="Analog Devices", Manufacturer Part Number 1=LT3042EDD#PBF, Package="DFN-10 Linear Technology", Supplier Part Number 1=505-LT3042EDD#PBF-ND, <Termination>=SMD, AL-PN=#1-051, Check_prices=https://www.snapeda.com/parts/LT3042EDD%23PBF/Analog+Devices/view-part/?ref=eda, Creator Project=DAP, Footprint Status=Verified, Lead Time="21 Weeks", MF="Analog Devices", MP=LT3042EDD#PBF, PartType=IC, SnapEDA_Link=https://www.snapeda.com/parts/LT3042EDD%23PBF/Analog+Devices/view-part/?ref=snap, Status=Unverified, SubType=LDO, Supplier 1=Digikey, Supplier Label="Linear Voltage Regulator IC Positive Adjustable 1 Output 200mA 10-DFN (3x3)", Type=Standard
U300: library part #1-124, <Rating>=133MHz, <Value>=64Bit, Manufacturer 1="Gigadevice Electronics Singapore PTE.LTD.", Manufacturer Part Number 1=GD25B64EWIGR, Supplier Part Number 1=1970-GD25B64EWIGRCT-ND, <Termination>=SMD, AL-PN=#1-124, Creator Project=DAP, Footprint Status=Verified, Lead Time=N/A, PartType=IC, Status=Unverified, SubType=FLASH, Supplier 1=Digikey, Supplier Label="FLASH - NOR (SLC) Memory IC 64Mbit SPI - Quad I/O 133 MHz 7 ns 8-WSON (5x6)", Type=Standard
U301: library part #1-055, Manufacturer 1="Espressif Technologies", Package=None, Supplier Part Number 1=1965-ESP32-S3-ND, <Termination>=SMD, AL-PN=#1-055, Availability="In Stock", Check_prices=https://www.snapeda.com/parts/ESP32-S3/Espressif+Systems/view-part/?ref=eda, Creator Project=DAP, Footprint Status=Verified, Lead Time="8 Weeks", Manufacturer Part Number 1=ESP32-S3, MF="Espressif Systems", MP=ESP32-S3, PartType=MCU, Price=None, Purchase-URL=https://pricing.snapeda.com/search/part/ESP32-S3/?ref=eda, SnapEDA_Link=https://www.snapeda.com/parts/ESP32-S3/Espressif+Systems/view-part/?ref=snap, Status=Unverified, SubType=ESP-32, Supplier 1=Digikey, Supplier Label="IC RF TxRx + MCU Bluetooth, WiFi 802.11b/g/n, Bluetooth v5.0 2.412GHz ~ 2.484GHz 56-VFQFN Exposed Pad", Type=Standard
U400: library part #1-128, Manufacturer 1="Rohm Semiconductor", Manufacturer Part Number 1=BD1604MUV-E2, Manufacturer_Name="ROHM Semiconductor", Supplier Part Number 1=BD1604MUV-E2CT-ND, <Termination>=SMD, AL-PN=#1-128, Copyright="Copyright (C) 2025 Ultra Librarian. All rights reserved.", Creator Project=DAP, Footprint Status=Verified, Lead Time="12 Weeks", Manufacturer_Part_Number=BD1604MUV-E2, Notes="Very slightly off", PartType=IC, RefDes=RefDes, Status=Unverified, SubType="LED Driver", Supplier 1=Digikey, Supplier Label="LED Driver IC 4 Output DC DC Regulator Switched Capacitor (Charge Pump) Dimming 30mA VQFN016V3030", Type=Standard
Y100: library part #1-100, <Rating>=2.2mA, <Value>=22.5792MHz, Manufacturer 1="ECS Inc.", Manufacturer Part Number 1=ECS-2520MVLC-225.792-CN-TR, Package=None, Supplier Part Number 1=50-ECS-2520MVLC-225.792-CN-TRCT-ND, <Termination>=SMD, AL-PN=#1-100, Availability=Unavailable, Creator Project=DAP, Footprint Status=Verified, Lead Time="19 Weeks", MP=ASTX-H11-24.576MHZ-T, PartType=Oscillator, Price=None, Status=Unverified, SubType=Crystal, Supplier 1=Digikey, Supplier Label="22.5792 MHz XO (Standard) CMOS Oscillator 1.6V ~ 3.6V Enable/Disable 4-SMD, No Lead", Type=Standard
Y101: library part #1-101, <Rating>=5.5mA, <Value>=24.576MHz, Manufacturer 1="Abracon LLC", Manufacturer Part Number 1=ASTX-H11-24.576MHZ-T, Package=None, Supplier Part Number 1=535-12038-1-ND, <Termination>=SMD, AL-PN=#1-101, Availability=Unavailable, Creator Project=DAP, Footprint Status=Verified, Lead Time="16 Weeks", MP=ASTX-H11-24.576MHZ-T, PartType=Oscillator, Price=None, Status=Unverified, SubType=Crystal, Supplier 1=Digikey, Supplier Label="24.576 MHz TCXO HCMOS Oscillator 3.3V Enable/Disable 4-SMD, No Lead", Type=Standard

## Free pads (board coordinates)
  round 5 hole 3.2: ""(3.877,3.877) ""(3.877,50.877) ""(50.877,3.877) ""(50.877,50.877)

## Via types
v1: diameter 0.5, hole 0.25, L1 (SIG/PWR) to L6 (SIG/PWR), tented both sides, 357 vias
v2: diameter 0.7, hole 0.35, L1 (SIG/PWR) to L6 (SIG/PWR), tented both sides, 69 vias
v3: diameter 1.25, hole 0.75, L1 (SIG/PWR) to L6 (SIG/PWR), 6 vias
v4: diameter 0.4/0.4/0.4/0.4/0.4/0.4 (per signal layer), hole 0.2, L1 (SIG/PWR) to L6 (SIG/PWR), tented both sides, 5 vias
v5: diameter 0.7, hole 0.3, L1 (SIG/PWR) to L6 (SIG/PWR), tented both sides, 3 vias

## Nets (pads, with @x,y where several pads share a name; then routed paths per layer and width w, separated by ;. In a path a pad name is that pad's centre, name@x,y a point inside that pad or via, vN(x,y) a via of type N, cw(c..) or ccw(c..) an arc to the next point about the centre after c; other vN are vias at no path point)
22.5792_OUT: R104.1 Y100.3 | length 1.3
  L1 (SIG/PWR) w0.152: R104.1@36.097,34.454 36.147,34.454 36.586,34.015 36.586,33.775 36.6,33.761 Y100.3@36.936,33.761
24.576_OUT: R105.2 Y101.3 | length 1.4
  L1 (SIG/PWR) w0.152: R105.2@35.132,34.446 35.132,33.227 Y101.3@35.31,33.227
40MHz_IN: C308.1 CR300.1 L301.1 | length 2.5
  L1 (SIG/PWR) w0.152: C308.1@21.794,29.595 22.553,29.595 CR300.1@22.847,29.301 ; CR300.1@22.915,28.985 22.902,28.972 22.902,28.846 23.438,28.31 23.763,28.31 L301.1@23.804,28.269
40MHz_OUT: C310.1 CR300.3 U301.53 | length 6
  L1 (SIG/PWR) w0.152: CR300.3@23.897,30.638 24.134,30.875 C310.1@24.134,31.576 ; CR300.3@23.897,30.651 23.897,30.601 24.822,29.676 24.822,27.794 24.213,27.185 24.213,26.395 U301.53@24.187,26.369
+3V3_ANALOG: C102.2 C103.2 C104.2 C105.2 C109.2 C111.2 C126.2 C128.2 C129.2 C217.3 R222.2 R251.2 TP205.1 U100.8 U101.8 U102.8 U103.2 U204.10 Y100.4 Y101.4 | length 66.3
  L1 (SIG/PWR) w0.203: v1@42.676,37.291 42.655,37.271 42.655,29.819 44.651,27.823 44.929,27.823 44.937,27.816 47.34,27.816 47.748,28.223 47.807,28.223 51.515,31.932 v1(51.515,38.079) ; R222.2@43.227,20.959 45.122,20.959 45.376,20.705 R251.2@45.546,20.705 ; v1@46.554,29.29 v1@46.588,29.29
  L4 (PWR) w0.203: v1@32.059,33.101 32.694,32.466 32.694,28.655 35.716,25.633 38.485,25.633 40.593,27.741 ; v1(36.867,29.048) 37.909,29.048 38.117,29.256 39.078,29.256 40.593,27.741 ; v1@44.557,21.083 v1(44.653,20.988) ; v1@44.596,21.122 42.092,23.626 ; v1(44.937,27.766) 44.886,27.715 44.886,27.182 45.102,26.966 45.432,26.966 ; v1@46.61,29.364 46.61,28.145 45.432,26.966 ; v1@46.689,26.496 46.689,26.471 46.27,26.052 44.517,26.052 ; 40.593,27.741 40.847,27.487 v1(40.847,25.277) 40.847,24.871 42.092,23.626 ; 42.092,23.626 42.803,24.337 44.517,26.052 ; 44.517,26.052 44.962,26.496 45.432,26.966
  other v1: 41.196,24.569 46.715,26.496 46.61,29.347 31.955,33.124 42.655,37.296
+3V3_DAC: B100.1 B100.10 B100.12 B100.27 C112.2 C113.2 C114.2 C115.2 C116.2 C119.2 C120.2 C121.2 C231.3 R243.2 TP206.1 U206.10 | length 33.9
  L1 (SIG/PWR) w0.254: 35.259,43.997 35.259,45.013 TP206.1@36.351,46.105 ; TP206.1@36.428,46.029 36.9,46.502 ; 38.002,41.355 38.676,41.355 v1(39.679,42.358) ; R243.2@38.587,53.319 37.621,53.319 36.9,52.598 36.9,46.502 ; v1@39.704,42.346 40.03,42.671 v1(40.03,45.662) 39.003,46.689 37.088,46.689 36.9,46.502
  L4 (PWR) w0.254: v1(34.125,35.404) 34.769,35.404 36.377,37.012 36.377,39.056 v1@39.679,42.358 ; v1(40.03,45.662) 41,46.632 41,49.051 v1@41.025,49.077
  other v1: 36.402,37.012 41,49.026
+3V3_DIG: B100.13 C122.2 C139.2 C225.2 C227.2 C228.2 C229.2 C300.2 C301.2 C303.2 C304.2 C305.2 C306.2 C307.2 C407.2 C408.2 C409.2 ENC400.4 J400.7 J400.8 J400.35 J400.40 J400.41 J400.42 J401.4 L300.2 R118.2 R208.2 R209.2 R210.2 R211.2 R223.2 R236.2 R241.2 R242.2 R253.2 R300.2 R301.2 R405.2 R407.2 R414.2 R415.2 R416.2 R417.2 R418.2 R419.2 SW400.2 SW400.4 SW401.2 SW401.4 SW402.2 SW402.4 TP203.1 U205.6 U301.20 U301.46 U301.55 U301.56 | length 127.4
  L1 (SIG/PWR) w0.203: R242.2@33.743,50.525 33.743,50.475 33.557,50.289 33.557,45.798 ; 34.218,43.87 34.218,43.946 33.557,44.606 33.557,45.798 ; v1(34.298,45.021) 34.298,45.058 33.557,45.798
  L1 (SIG/PWR) w0.254: R253.2@2.442,42.981 2.468,43.006 5.518,43.006 ; v1(3.789,18.597) 3.836,18.644 3.836,18.73 4.356,19.25 J400.35@5.338,19.25 ; R208.2@13.898,10.291 14.431,10.291 16.133,11.993 v1(16.133,12.018) ; v1(14.915,17.209) 14.915,16.578 14.919,16.575 14.919,16.204 R210.2@14.99,16.133 ; C225.2@18.495,40.644 19.459,40.644 v1(20.057,41.242) 20.09,41.208 20.09,39.749 20.16,39.679 R236.2@20.375,39.679 ; v1(18.546,14.101) 18.613,14.101 19.019,13.695 ; R300.2@19.773,13.695 19.019,13.695 ; R209.2@20.587,1.604 20.609,1.625 20.609,2.575 v1@20.654,2.62 ; R211.2@23.143,15.117 23.106,15.08 23.106,14.8 22.686,14.38 19.705,14.38 19.019,13.695 ; v1(32.688,52.173) 32.735,52.126 32.947,52.126 33.786,51.287 R242.2@33.786,50.626 ; R223.2@33.024,24.82 33.074,24.82 33.579,25.325 33.579,25.642 33.511,25.711 v1(33.511,25.777)
  L4 (PWR) w0.254: v1(20.63,2.536) 21.45,3.357 31.322,3.357 33.456,1.223 34.345,1.223 36.174,3.052 ; 24.947,13.872 25.201,14.126 v1(26.369,14.126) ; 25.226,45.902 33.454,45.902 34.298,45.058 v1(34.298,45.021) ; 27.538,51.82 32.414,51.82 v1@32.821,52.226 ; 27.563,26.445 28.231,25.777 v1(33.511,25.777) ; ENC400.4@37.342,4.119 37.24,4.119 36.174,3.052 ; v1(39.247,3.611) 38.688,3.052 36.174,3.052
  L6 (SIG/PWR) w0.203: v1(39.247,3.611) 39.304,3.554 39.304,3.434 39.661,3.077 R407.2@39.661,3.027
  L6 (SIG/PWR) w0.254: SW401.2@1.364,26.223 1.364,26.123 1.737,25.75 1.76,25.75 1.909,25.601 1.909,21.268 1.604,20.963 SW401.4@1.604,20.553 ; SW401.4@1.426,20.324 1.462,20.288 v1(1.462,19.472) ; v1(5.67,53.967) 5.737,53.967 6.272,53.432 SW402.4@8.024,53.432 ; SW402.4@8.099,53.457 8.619,52.938 13.003,52.938 13.124,53.059 13.283,53.059 SW402.2@13.517,53.293 ; v1(14.915,17.209) 16.117,17.209 18.729,19.821 21.919,19.821 22.026,19.928 R301.2@22.026,20.045 ; R417.2@16.387,40.407 16.391,40.403 R416.2@17.378,40.403 ; v1(16.436,54.054) 16.503,54.054 16.752,53.805 17.708,53.805 18.454,53.059 18.539,53.059 18.817,52.781 22.83,52.781 23.342,53.293 SW400.2@23.448,53.293 ; R416.2@17.378,40.399 17.382,40.403 R414.2@18.343,40.403 ; R414.2@18.343,40.407 19.222,40.407 19.976,41.161 19.976,41.271 v1@19.968,41.279 ; v1(26.369,14.126) 26.369,13.72 27.019,13.071 27.019,12.646 R118.2@27.063,12.602 ; v1@26.42,14.177 26.471,14.126 28.858,14.126 30.611,12.374 34.831,12.374 v1(36.14,11.065) ; v1@32.77,52.15 33.011,51.91 33.511,51.91 R241.2@33.634,51.787 ; v1@36.148,11.028 36.295,10.881 36.803,10.881 36.926,10.758 R405.2@36.926,10.723
  other v1: 7.343,16.53 25.125,18.546 16.874,26.339 22.7,26.811 26.928,26.903 19.486,28.681 6.089,33.014 16.291,36.183 9.73,42.007 7.929,42.016 6.252,42.041
+3V9: C204.2 C211.2 C220.2 C232.2 L201.1 R200.2 R225.2 R244.2 R250.2 TP209.1 U200.6 U201.6 U204.1 U204.2 U206.1 U206.2 | length 54.2
  L1 (SIG/PWR) w0.254: 22.381,48.416 22.381,49.169 22.716,49.504 22.716,49.554 22.839,49.677 R250.2@22.889,49.677 ; 27.487,45.622 28.284,46.419 30.417,46.419 R200.2@30.459,46.461
  L4 (PWR) w0.254: v1(21.421,44.408) 28.447,44.408 28.858,43.997 40.365,43.997 ; v1(36.097,26.75) 34.908,27.94 34.908,31.273 40.365,36.73 40.365,43.997 ; v1(44.886,46.334) 44.886,45.241 43.641,43.997 40.365,43.997
  L6 (SIG/PWR) w0.381: v1(21.802,47.98) 21.802,48.446 23.601,50.245 24.751,50.245
+LED: C400.2 C413.2 J400.1 TP406.1 U400.6 | length 7.3
  L4 (PWR) w0.254: v1(5.643,37.19) 5.68,37.227 9.569,37.227 v1@11.917,34.879
  other v1: 11.931,34.865
-3V3: C108.2 C110.2 C125.2 C134.2 C135.2 C216.3 R220.2 R252.2 TP207.1 U100.4 U100.9 U101.4 U101.9 U102.4 U102.9 U103.4 U103.11 U203.11 U203.12 | length 76.4
  L4 (PWR) w0.254: v1@38.333,54.309 38.333,54.308 39.55,53.09 43.159,53.09 44.53,51.718 v1(44.53,49.585) 45.927,48.188 45.927,45.207 v1(45.328,44.608) 45.327,44.606 v1@45.292,44.606 ; 41,39.882 v1(41,42.244) ; 41.025,41.326 43.54,41.326 ; v1(43.997,31.983) 43.997,33.761 44.225,33.989 44.225,35.488 44.993,36.255 ; 45.622,31.932 45.622,32.465 ; 48.239,22.635 48.239,23.435 49.61,24.807 49.61,26.849 48.642,27.817 ; v1@48.62,26.598 48.642,26.621 48.642,27.817 ; 49.788,40.619 46.178,40.619 45.471,41.326 43.54,41.326 ; 43.54,41.326 43.54,37.708 44.993,36.255 ; 44.993,36.255 45.622,35.625 45.622,32.465 ; 45.622,32.465 46.435,32.465 48.642,30.258 48.642,27.817
  L6 (SIG/PWR) w0.254: R220.2@36.859,52.785 36.898,52.785 38.265,54.153 38.265,54.281 v1(38.312,54.328) ; C108.2@40.111,40.822 40.111,41.457 40.775,42.121 40.81,42.121 40.961,42.272 v1@40.961,42.307 ; v1(41,42.244) 41.875,42.244 42.332,41.787 44.657,41.787 45.775,42.905 ; v1@45.386,44.556 45.775,44.167 45.775,42.905 ; U101.4@48.877,40.118 49.754,40.118 50.22,39.653 U101.9@50.22,39.425 ; C110.2@48.917,41.473 48.917,41.523 48.794,41.646 48.532,41.646 47.273,42.905 45.775,42.905 ; C110.2@48.992,41.56 49.078,41.646 49.165,41.646 49.325,41.805 49.325,43.788 49.813,44.276 R252.2@49.813,45.46
  other v1: 48.642,26.604
-3V9: C205.2 C206.2 C218.2 L202.2 R201.2 R219.2 R249.2 TP208.1 U203.1 U203.2 | length 11.3
  L6 (SIG/PWR) w0.254: 27.03,43.875 27.03,43.395 27.246,43.179 27.296,43.179 27.419,43.056 R249.2@27.419,43.006 ; 31.3,45.191 32.033,45.191 33.938,47.096 38.688,47.096 39.272,47.68 ; R219.2@37.698,49.051 38.893,49.051
ADDR_DAC: B100.25 R135.1 | length 2.2
  L1 (SIG/PWR) w0.152: v1(32.491,37.063) 32.557,37.129 32.557,37.295 32.725,37.463 B100.25@33.329,37.463
  L6 (SIG/PWR) w0.152: v1(32.491,37.063) 32.491,36.969 32.627,36.832 32.627,36.238 32.742,36.123 R135.1@32.846,36.123
BAT+: C215.2 J200.1 TP210.1 U202.11 U202.12 | length 9
  L6 (SIG/PWR) w0.508: J200.1@3.841,10.667 4.006,10.501 4.315,10.501 TP210.1@5.922,8.894 ; TP210.1@5.882,8.854 7.671,7.065 C215.2@11.332,7.065
BOOT0: R301.1 R302.1 TP300.1 U301.5 | length 20.3
  L1 (SIG/PWR) w0.152: U301.5@22.188,23.722 22.222,23.688 22.617,23.688 23.026,23.278 23.026,22.931 v1(23.093,22.864) ; R302.1@30.68,13.822 31.931,13.822 32.185,14.076 TP300.1@32.414,14.076
  L3 (SIG) w0.152: v1(23.093,22.864) 23.093,22.138 24.932,20.299 24.947,20.299 27.944,17.301 27.944,15.625 29.712,13.857 31.261,13.857 v1@31.322,13.796
  L6 (SIG/PWR) w0.152: R301.1@23.042,19.994 23.042,20.044 22.868,20.218 22.774,20.218 22.178,20.814 22.178,21.95 23.042,22.813 v1@23.042,22.864
  other v1: 31.418,13.857
BOOT_BQ: C207.2 U202.21 | length 2.6
  L6 (SIG/PWR) w0.254: U202.21@16.29,6.147 16.446,6.147 16.512,6.213 18.503,6.213 18.717,5.998 v1(18.775,5.998)
CD_SD: J401.CD R419.1 U301.6 | length 14.1
  L1 (SIG/PWR) w0.152: v1(20.031,23.452) 20.085,23.398 20.51,23.398 20.586,23.322 U301.6@22.188,23.322
  L6 (SIG/PWR) w0.152: J401.CD@14.941,30.536 15.391,30.536 15.72,30.865 17.937,30.865 18.267,30.535 18.267,30.433 17.657,29.823 17.657,25.861 20.031,23.487 v1(20.031,23.452)
CE_BQ: R221.2 U202.1 U301.19 | length 27.5
  L1 (SIG/PWR) w0.152: v1(17.781,0.642) 18.543,0.642 R221.2@18.571,0.614 ; v1@22.102,8.183 22.915,8.996 23.855,8.996 24.613,9.754 U301.19@24.613,19.297
  L3 (SIG) w0.152: v1(17.781,0.642) 20.862,3.722 20.862,5.856 22.139,7.133 22.139,7.966 v1@22.204,8.03
  L6 (SIG/PWR) w0.152: U202.1@15.605,3.962 15.605,2.12 17.086,0.639 v1@17.886,0.639
  other v1: 22.139,8.101
CHIP_PU: C309.2 R300.1 SW300.3 SW300.4 TP301.1 U301.4 | length 30.2
  L1 (SIG/PWR) w0.152: TP301.1@17.606,14.99 17.441,14.825 17.441,13.606 18.512,12.534 SW300.4@19.468,12.534 SW300.3@23.651,12.534 ; C309.2@19.816,24.364 20.224,23.956 21.307,23.956 21.473,24.122 U301.4@22.188,24.122 ; R300.1@20.773,13.695 23.118,13.695 23.638,14.214 23.939,14.214 v1(23.974,14.25) 23.974,12.783 23.692,12.501 SW300.3@23.651,12.501
  L3 (SIG) w0.152: v1(21.213,23.956) 20.807,24.363 19.714,24.363 18.8,23.448 18.8,19.323 23.793,14.33 v1@23.829,14.33
CLK_SD: D401.2 J401.5 R307.2 TP303.1 | length 18.7
  L1 (SIG/PWR) w0.151: D401.2@18.165,34.396 18.58,34.396 v1(19.435,33.541) 19.529,33.541 19.697,33.71 20.002,33.71 20.51,33.202 20.815,33.202 21.323,33.71 21.628,33.71 22.136,34.218 22.44,34.218 22.948,33.71 24.921,33.71 26.039,32.592 26.039,28.325 R307.2@25.861,28.147
  L6 (SIG/PWR) w0.151: J401.5@15.701,34.675 16.184,34.675 17.318,33.541 17.622,33.541 18.13,34.049 18.435,34.049 18.943,33.541 v1(19.435,33.541)
CMD_SD: D401.4 J401.3 R414.1 U301.48 | length 24.4
  L1 (SIG/PWR) w0.151: D401.4@18.063,35.462 18.444,35.462 19.029,36.047 ; v1(19.029,37.367) 19.029,36.047 ; U301.48@26.213,26.147 26.213,27.072 26.471,27.329 26.471,32.948 24.921,34.497 21.34,34.497 19.791,36.047 19.029,36.047
  L6 (SIG/PWR) w0.151: J401.3@14.941,37.136 15.665,37.367 v1(19.029,37.367) ; R414.1@18.472,39.298 18.978,38.792 v1@18.978,37.418
CS_LCD: J400.38 R413.2 U301.15 | length 18.3
  L1 (SIG/PWR) w0.152: J400.38@5.517,17.76 7.733,17.76 8.016,18.043 8.081,18.107 R413.2@8.081,18.262 ; R413.2@8.191,18.267 8.191,18.317 9.106,19.232 22.98,19.232 23.016,19.268 U301.15@23.016,19.435
D/CX_LCD: J400.36 TP404.1 U301.13 | length 18.3
  L1 (SIG/PWR) w0.152: J400.36@5.338,18.75 6.151,18.75 8.589,21.188 TP404.1@9.478,21.188 12.933,21.188 13.745,20.375 21.647,20.375 21.758,20.486 21.85,20.486 21.853,20.488 22.155,20.488 U301.13@22.188,20.522
DACL: B100.8 C107.2 R103.1 U101.6 | length 21.7
  L1 (SIG/PWR) w0.152: B100.8@36.329,40.263 41.939,40.263 42.586,40.909 v1@53.965,40.909
  L6 (SIG/PWR) w0.152: U101.6@51.577,39.618 52.42,39.618 52.684,39.882 C107.2@52.684,40.111 ; C107.2@52.814,40.026 53.897,40.026 R103.1@54.033,39.89 ; v1@53.954,40.898 54.033,40.818 R103.1@54.033,39.933 ; R103.1@53.961,39.89 R103.1@54.004,39.933
  other v1: 53.985,40.909
DACLB: B100.9 C101.2 R101.1 U101.2 | length 16.6
  L1 (SIG/PWR) w0.152: B100.9@36.329,40.663 40.637,40.663 41.457,41.482 46.265,41.482 46.417,41.635 v1(46.511,41.635)
  L6 (SIG/PWR) w0.152: R101.1@46.413,38.417 46.384,38.445 46.384,41.413 46.511,41.54 v1(46.511,41.635) ; R101.1@46.537,38.383 46.537,38.49 46.814,38.767 47.556,38.767 48.184,38.767 48.486,39.069 48.874,39.069 U101.2@48.899,39.095
DACR: B100.3 C100.2 R100.1 U100.2 | length 4.4
  L1 (SIG/PWR) w0.152: B100.3@36.329,38.263 37.14,38.263 37.545,38.668 v1@37.545,38.739
  L6 (SIG/PWR) w0.152: v1@37.571,38.637 37.612,38.596 R100.1@37.612,37.889 38.431,37.889 38.587,38.045 C100.2@38.587,38.104 ; C100.2@38.755,38.189 38.847,38.282 U100.2@39.755,38.282
  other v1: 37.602,38.725
DACRB: B100.2 C106.2 R102.1 U100.6 | length 13.5
  L1 (SIG/PWR) w0.152: B100.2@36.329,37.863 42.917,37.863 v1(45.191,40.136)
  L6 (SIG/PWR) w0.152: U100.6@42.649,38.804 43.432,38.804 43.952,39.323 43.971,39.323 C106.2@44.038,39.39 ; C106.2@44.048,39.349 44.178,39.218 R102.1@45.156,39.218 45.191,39.253 v1(45.191,40.136)
DAT0_SD: D401.1 J401.7 R415.1 TP302.1 U301.50 | length 22.7
  L1 (SIG/PWR) w0.151: D401.1@17.974,33.929 18.047,33.929 18.095,33.88 18.095,32.992 19.478,31.61 20.24,31.61 v1(20.273,31.576) ; v1@20.248,31.678 20.283,31.643 20.501,31.643 20.536,31.678 20.807,31.678 22.254,33.126 24.718,33.126 25.502,32.342 25.502,29.805 25.356,29.659 25.356,27.123 25.413,27.065 U301.50@25.413,26.252
  L6 (SIG/PWR) w0.151: J401.7@15.588,32.68 15.893,32.68 16.401,33.188 16.706,33.188 17.214,32.68 18.975,32.68 20.013,31.643 20.207,31.643 v1(20.273,31.576) 20.262,31.565 R415.1@20.262,30.646
DAT3_SD: D401.5 J401.2 R416.1 | length 6.6
  L1 (SIG/PWR) w0.152: v1(17.809,37.977) 17.809,37.892 17.987,37.714 D401.5@17.987,35.996
  L6 (SIG/PWR) w0.152: J401.2@14.941,38.236 15.2,37.977 v1(17.809,37.977) 17.809,38.423 17.526,38.707 17.526,39.251 R416.1@17.378,39.399
DATA1_DAC: B100.19 TP100.1 U301.43 | length 17.5
  L1 (SIG/PWR) w0.152: U301.43@28.213,26.147 28.213,26.362 28.681,26.829 ; 28.706,26.826 28.706,28.528 28.604,28.63 28.604,31.678 28.452,31.83 28.452,37.393 30.922,39.863 B100.19@33.348,39.863
DATA2_DAC: B100.18 TP101.1 U301.44 | length 18.8
  L1 (SIG/PWR) w0.152: U301.44@27.813,26.147 27.847,26.18 27.847,26.589 28.096,26.839 28.096,28.503 27.944,28.655 27.944,31.729 27.563,32.11 27.563,37.952 29.874,40.263 B100.18@33.227,40.263
DATA_CLK_DAC: B100.20 TP102.1 U301.42 | length 16.9
  L1 (SIG/PWR) w0.152: U301.42@29.038,25.322 29.155,25.322 29.189,25.355 29.189,36.936 31.716,39.463 B100.20@33.329,39.463
DVDD: B100.15 C117.2
EN1_BQ: R209.1 U202.2 | length 8.2
  L1 (SIG/PWR) w0.152: v1(15.523,0.461) 15.57,0.508 16.002,0.508 17.098,1.604 R209.1@19.537,1.604
  L6 (SIG/PWR) w0.152: U202.2@15.105,3.962 15.105,0.88 v1(15.523,0.461)
EN2_BQ: R216.2 U202.3 | length 3.5
  L1 (SIG/PWR) w0.152: R216.2@14.169,0.588 14.324,0.743 v1@14.324,1.401
  L6 (SIG/PWR) w0.152: v1(14.305,1.476) 14.305,1.483 14.561,1.739 14.561,3.918 U202.3@14.605,3.962
EN_DAC_LDO+: R244.1 R247.2 U206.3
EN_LDO+: R225.1 R231.2 U204.3
ENC_A_1: D400.5 ENC400.1 R400.1 R405.1 | length 10.4
  L6 (SIG/PWR) w0.203: ENC400.1@37.342,1.72 38.704,3.083 38.704,4.58 38.558,4.726 38.464,4.726 38.3,4.89 38.3,4.985 38.155,5.13 38.155,7.345 38.653,7.842 38.653,8.955 38.092,9.516 38.092,9.711 R400.1@38.024,9.779 ; R405.1@37.926,10.723 37.935,10.714 37.935,9.774 R400.1@37.977,9.732
ENC_B_1: D400.2 ENC400.3 R407.1 R408.2 | length 9.5
  L6 (SIG/PWR) w0.203: D400.2@40.212,4.398 40.228,4.383 40.228,3.739 40.522,3.444 40.522,3.166 R407.1@40.661,3.027 ; ENC400.3@42.342,1.72 42.148,1.915 41.451,1.915 40.779,2.587 40.779,2.909 R407.1@40.661,3.027 ; R408.2@42.955,5.567 42.955,5.509 43.717,4.747 43.717,3.738 42.981,3.001 41.711,3.001 41.685,3.027 R407.1@40.661,3.027
FB_BB_3.3: C225.1 C226.1 R236.1 R240.2 U205.9
FB_BB_3.9: R200.1 R212.2 R213.2 U200.9 | length 2.3
  L1 (SIG/PWR) w0.203: U200.9@28.901,44.328 28.952,44.379 28.952,44.871 29.5,45.419 30.362,45.419 30.433,45.491 R200.1@30.433,45.495